# Altium PCB TM_DE_Display_REV1.0.PcbDoc (part 1 of 2)
Units mm, origin at the board's own origin, x right, y up, seen from the top; angles counter-clockwise.
Board outline 155.6 x 46.6 mm, 2 copper layers (Top Layer, Bottom Layer); 284 components, 274 nets, 1006 pads, 129 vias.
Unrouted connection lines stored in the file: 576.
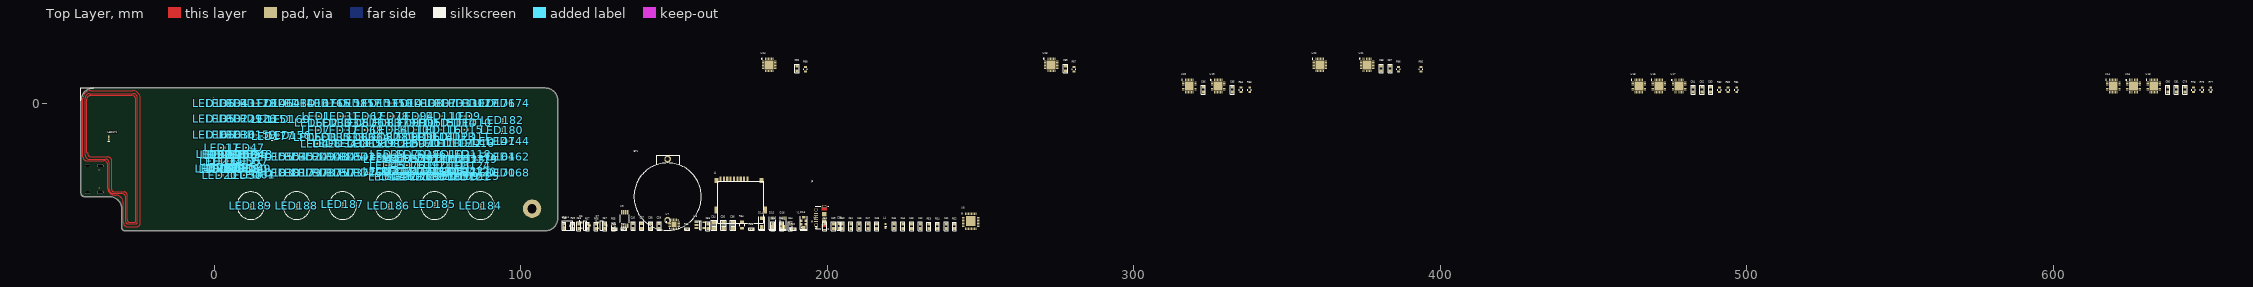
[diagram p0: Top Layer view]
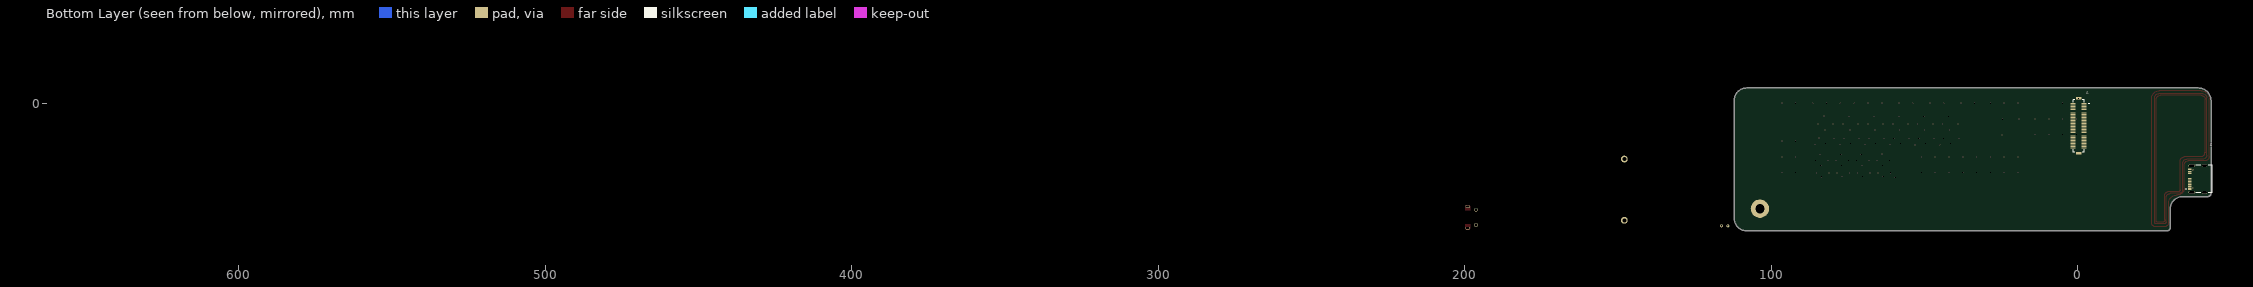
[diagram p1: Bottom Layer view, seen from below]

## Layer stack, top to bottom
Top Solder: solder mask 0.0102, Solder Resist, Dk 3.5
Top Layer: signal copper 0.0356
Dielectric 1: dielectric 0.32, FR-4, Dk 4.8
Bottom Layer: signal copper 0.0356
Bottom Solder: solder mask 0.0102, Solder Resist, Dk 3.5

## Board outline
-43.466,-29.4 ccw(c-42.446,-29.4) -42.446,-30.419 -34.266,-30.419 cw(c-34.266,-34.516) -30.169,-34.516 -30.169,-40.6 -30.166,-40.58 ccw(c-29.146,-40.58) -29.146,-41.599 -29.146,-41.6 108.037,-41.6 ccw(c108.037,-37.503) 112.134,-37.503 112.134,0.903 ccw(c108.037,0.903) 108.037,5 -39.369,5 ccw(c-39.369,0.903) -43.466,0.903

## Design rules (kind name [scope] priority, off if disabled: settings)
Clearance [All] p1: gap=0.254 ignorepadtopadclearanceinfootprint=TRUE
PolygonConnect [All] p1: connectstyle=Relief reliefconductorwidth=0.254 reliefentries=4 polygonreliefangle="90 Angle" airgapwidth=0.254
RoutingVias [All] p1: holewidth=0.711 width=1.27 viastyle="Through Hole" minholewidth=0.711 minwidth=1.27 maxholewidth=0.711 maxwidth=1.27
SolderMaskExpansion [All] p1: expansion=0 istentingtop=FALSE
SupplyNets "Schematic Supply Nets_6" [InNet('+3V3')] p1: voltage=0.000
SupplyNets "Schematic Supply Nets_5" [InNet('GND')] p2: voltage=0.000
SupplyNets "Schematic Supply Nets_4" [InNet('EARTH')] p3: voltage=0.000
SupplyNets "Schematic Supply Nets_3" [InNet('+5VDC')] p4: voltage=0.000
SupplyNets "Schematic Supply Nets_2" [InNet('VBUSA')] p5: voltage=0.000
SupplyNets "Schematic Supply Nets_1" [InNet('USB_5V')] p6: voltage=0.000
SupplyNets "Schematic Supply Nets" [InNet('+3V3DC')] p7: voltage=0.000
Width [All] p1: maxlimit=0.254 minlimit=0.254 preferedwidth=0.254
30 further rules are at their usual default settings.

## Classes and differential pairs
component class U_06_RFID_RTC_Storage: BT1 C41 C42 C43 C44 C45 C46 C47 C48 C49 C50 C51 C52 C53 C54 C55 C56 C57 C58 J4 L4 L5 R52 R53 R54 R55 R56 R57 U8 U9 XTAL1 Y1
component class U_09_Display_Leds-2: C87 C88 C89 C90 LED126 LED127 LED128 LED129 LED130 LED131 LED132 LED133 LED134 LED135 LED136 LED137 LED138 LED139 LED140 LED141 LED142 LED143 LED144 LED145 LED146 LED147 LED148 LED149 LED150 LED151 LED152 LED153 LED154 LED155 LED156 LED157 LED158 LED159 LED160 LED161 LED162 LED163 LED164 LED165 LED166 LED167 LED168 LED169 LED170 LED171 LED172 LED173 LED174 LED175 LED176 LED177 LED178 LED179 LED180 LED181 LED182 LED183 LED184 LED185 LED186 LED187 LED188 LED189 R85 R86 R87 R88 U21 U22 U23 U24
component class U_08_Display_Leds: C79 C80 C81 C82 C83 C84 C85 C86 LED1 LED2 LED3 LED4 LED5 LED6 LED7 LED8 LED9 LED10 LED11 LED12 LED13 LED14 LED15 LED16 LED17 LED18 LED19 LED20 LED21 LED22 LED23 LED24 LED25 LED26 LED27 LED28 LED29 LED30 LED31 LED32 LED33 LED34 LED35 LED36 LED37 LED38 LED39 LED40 LED41 LED42 LED43 LED44 LED45 LED46 LED47 LED48 LED49 LED50 LED51 LED52 LED53 LED54 LED55 LED56 LED57 LED58 LED59 LED60 LED61 LED62 LED63 LED64 LED65 LED66 LED67 LED68 LED69 LED70 LED71 LED72 LED73 LED74 LED75 LED76 LED77 LED78 LED79 LED80 LED81 LED82 LED83 LED84 LED85 LED86 LED87 LED88 LED89 LED90 LED91 LED92 LED93 LED94 LED95 LED96 LED97 LED98 LED99 LED100 LED101 LED102 LED103 LED104 LED105 LED106 LED107 LED108 LED109 LED110 LED111 LED112 LED113 LED114 LED115 LED116 LED117 LED118 LED119 LED120 LED121 LED122 LED123 LED124 LED125 R77 R78 R79 R80 R81 R82 R83 R84 U13 U14 U15 U16 U17 U18 U19 U20
component class U_05_USB_UART_Service: C33 C34 C35 C36 C37 C38 C39 C40 D13 D14 D15 D16 J2 J3 Q6 Q7 R32 R33 R34 R35 R36 R37 R38 R39 U6 U7
component class TOP: J1

## Components (designator, comment, footprint, x,y, rotation, side; value= is the part's Value field where it differs from the comment)
BT1 "DS1092-04-B6P" DB1092 147.964,-28.203 r90 top
C33 "CL10A105KA8NNNC" CAP_0603 203.975,-40.05 r90 top value=1uF
C34 "CL21A226MPCLRNC" CAP_0805 163.075,-39.85 r90 top value=22uF
C35 "CL21A226MPCLRNC" CAP_0805 166.175,-39.85 r90 top value=22uF
C36 "CL21A226MPCLRNC" CAP_0805 169.275,-39.85 r90 top value=22uF
C37 "CL10B104KB8NNNL" CAP_0603 139.475,-40.05 r90 top value=100nF
C38 "CL10B104KB8NNNL" CAP_0603 142.375,-40.05 r90 top value=100nF
C39 "CL10B104KB8NNNL" CAP_0603 145.175,-40.05 r90 top value=100nF
C40 "CL10B104KB8NNNL" CAP_0603 136.675,-40.05 r90 top value=100nF
C41 "CAP" CAP_0603 238.872,-40.127 r90 top value=100nF
C42 "CAP" CAP_0603 230.388,-40.127 r90 top value=100nF
C43 "CAP" CAP_0603 227.546,-40.127 r90 top value=100nF
C44 "CAP" CAP_0603 224.686,-40.127 r90 top value=100nF
C45 "CL10C150JB8NNNC" CAP_0603 221.833,-40.127 r90 top value=15pF
C46 "CL10C470JB8NNNC" CAP_0603 210.483,-40.127 r90 top value=47pF
C47 "CL10C181JB8NNNC" CAP_0603 213.332,-40.127 r90 top value=180pF
C48 "CL10C100CB8NNNC" CAP_0603 216.172,-40.127 r90 top value=10pF
C49 "CL10C470JB8NNNC" CAP_0603 202.073,-40.127 r90 top value=47pF
C50 "CL10C181JB8NNNC" CAP_0603 204.912,-40.127 r90 top value=180pF
C51 "CL10C100CB8NNNC" CAP_0603 207.748,-40.127 r90 top value=10pF
C52 "CL10C150JB8NNNC" CAP_0603 199.236,-40.127 r90 top value=15pF
C53 "CL10C180JB8NNNC" CAP_0603 185.145,-40.127 r90 top value=18pF
C54 "CL10C180JB8NNNC" CAP_0603 187.987,-40.127 r90 top value=18pF
C55 "CAP" CAP_0603 182.291,-40.127 r90 top value=100nF
C56 "CAP" CAP_0603 161.072,-40.127 r90 top value=100nF
C57 "CL10C180JB8NNNC" CAP_0603 127.473,-40.127 r90 top value=18pF
C58 "CL10C180JB8NNNC" CAP_0603 118.997,-40.127 r90 top value=18pF
C79 "CAP" CAP_0603 643.074,4.45 r90 top value=100nF
C80 "CAP" CAP_0603 637.474,4.45 r90 top value=100nF
C81 "CAP" CAP_0603 640.274,4.45 r90 top value=100nF
C82 "CAP" CAP_0603 485.474,4.45 r90 top value=100nF
C83 "CAP" CAP_0603 488.274,4.45 r90 top value=100nF
C84 "CAP" CAP_0603 482.574,4.45 r90 top value=100nF
C85 "CAP" CAP_0603 332.175,4.45 r90 top value=100nF
C86 "CAP" CAP_0603 322.775,4.45 r90 top value=100nF
C87 "CAP" CAP_0603 383.674,11.35 r90 top value=100nF
C88 "CAP" CAP_0603 380.774,11.35 r90 top value=100nF
C89 "CAP" CAP_0603 277.775,11.35 r90 top value=100nF
C90 "CAP" CAP_0603 190.175,11.35 r90 top value=100nF
D13 "PMEG4010EGWJ" SOD-123 192.375,-38.85 r90 top value="40V 1A"
D14 "ATV02W5V0B-HF" SOD-123F 178.675,-38.95 r90 top
D15 "ATV02W5V0B-HF" SOD-123F 182.175,-38.95 r90 top
D16 "ATV02W5V0B-HF" SOD-123F 185.675,-38.95 r90 top
J1 "DF12NB(3.0)-60DS-0.5V(51)" HRS_DF12NB(3.0)-60DS-0.5V(51) -0.266,-7.35 r90 bottom
J2 "TYPE-C 16PIN 2MD(073)" HRO_TYPE-C-31-M-12 -41.336,-24.725 r90 bottom
J3 "10118194-0001LF" AMPHENOL_10118194-0001LF 199.075,-37.25 r90 top
J4 "microsd" microSD_2 171.76,-29.941 r0 top
L4 "LQM18PN2R2NC0L" LQM18PN1R0NC0L 219.077,-40.075 r90 top value=2.2uH
L5 "LQM18PN2R2NC0L" LQM18PN1R0NC0L 196.481,-40.075 r90 top value=2.2uH
LED1 "YLED0402R" APHHS1005LSECKJ3PF 33.538,-4.287 r180 top value=0402
LED2 "YLED0402R" APHHS1005LSECKJ3PF 35.992,-6.314 r86 top value=0402
LED3 "YLED0402R" APHHS1005LSECKJ3PF 35.662,-11.013 r86 top value=0402
LED4 "YLED0402R" APHHS1005LSECKJ3PF 32.995,-13.147 r180 top value=0402
LED5 "YLED0402R" APHHS1005LSECKJ3PF 30.683,-11.038 r86 top value=0402
LED6 "YLED0402R" APHHS1005LSECKJ3PF 31.014,-6.314 r86 top value=0402
LED7 "YLED0402R" APHHS1005LSECKJ3PF 33.259,-8.727 r180 top value=0402
LED8 "YLED0402R" APHHS1005LSECKJ3PF 36.932,-13.07 r86 top value=0402
LED9 "YLED0402R" APHHS1005LSECKJ3PF 82.375,-4.243 r180 top value=0402
LED10 "YLED0402R" APHHS1005LSECKJ3PF 84.828,-6.27 r86 top value=0402
LED11 "YLED0402R" APHHS1005LSECKJ3PF 84.498,-10.969 r86 top value=0402
LED12 "YLED0402R" APHHS1005LSECKJ3PF 81.831,-13.102 r180 top value=0402
LED13 "YLED0402R" APHHS1005LSECKJ3PF 79.52,-10.994 r86 top value=0402
LED14 "YLED0402R" APHHS1005LSECKJ3PF 79.85,-6.27 r86 top value=0402
LED15 "YLED0402R" APHHS1005LSECKJ3PF 82.095,-8.683 r180 top value=0402
LED16 "YLED0402R" APHHS1005LSECKJ3PF 85.768,-13.026 r86 top value=0402
LED17 "YLED0402R" APHHS1005LSECKJ3PF 2.618,-14.465 r180 top value=0402
LED18 "YLED0402R" APHHS1005LSECKJ3PF 5.134,-16.6 r265 top value=0402
LED19 "YLED0402R" APHHS1005LSECKJ3PF 4.734,-21.4 r86 top value=0402
LED20 "YLED0402R" APHHS1005LSECKJ3PF 1.934,-23.5 r180 top value=0402
LED21 "YLED0402R" APHHS1005LSECKJ3PF -0.266,-21.3 r86 top value=0402
LED22 "YLED0402R" APHHS1005LSECKJ3PF 0.034,-16.6 r86 top value=0402
LED23 "YLED0402R" APHHS1005LSECKJ3PF 1.085,-18.951 r180 top value=0402
LED24 "YLED0402R" APHHS1005LSECKJ3PF 3.785,-18.951 r180 top value=0402
LED25 "YLED0402R" APHHS1005LSECKJ3PF 1.311,-16.751 r300 top value=0402
LED26 "YLED0402R" APHHS1005LSECKJ3PF 2.584,-16.95 r266 top value=0402
LED27 "YLED0402R" APHHS1005LSECKJ3PF 3.833,-16.651 r230 top value=0402
LED28 "YLED0402R" APHHS1005LSECKJ3PF 0.985,-21.5 r230 top value=0402
LED29 "YLED0402R" APHHS1005LSECKJ3PF 2.234,-20.9 r86 top value=0402
LED30 "YLED0402R" APHHS1005LSECKJ3PF 3.509,-21.425 r120 top value=0402
LED31 "YLED0402R" APHHS1005LSECKJ3PF 41.682,-4.287 r180 top value=0402
LED32 "YLED0402R" APHHS1005LSECKJ3PF 44.136,-6.314 r86 top value=0402
LED33 "YLED0402R" APHHS1005LSECKJ3PF 43.806,-11.013 r86 top value=0402
LED34 "YLED0402R" APHHS1005LSECKJ3PF 41.139,-13.147 r180 top value=0402
LED35 "YLED0402R" APHHS1005LSECKJ3PF 38.827,-11.038 r86 top value=0402
LED36 "YLED0402R" APHHS1005LSECKJ3PF 39.157,-6.314 r86 top value=0402
LED37 "YLED0402R" APHHS1005LSECKJ3PF 41.403,-8.727 r180 top value=0402
LED38 "YLED0402R" APHHS1005LSECKJ3PF 45.076,-13.07 r86 top value=0402
LED39 "YLED0402R" APHHS1005LSECKJ3PF 56.815,-16.639 r180 top value=0402
LED40 "YLED0402R" APHHS1005LSECKJ3PF 58.831,-18.174 r86 top value=0402
LED41 "YLED0402R" APHHS1005LSECKJ3PF 58.526,-22.235 r86 top value=0402
LED42 "YLED0402R" APHHS1005LSECKJ3PF 56.353,-23.918 r180 top value=0402
LED43 "YLED0402R" APHHS1005LSECKJ3PF 54.438,-22.216 r86 top value=0402
LED44 "YLED0402R" APHHS1005LSECKJ3PF 54.725,-18.211 r86 top value=0402
LED45 "YLED0402R" APHHS1005LSECKJ3PF 56.612,-20.265 r180 top value=0402
LED46 "YLED0402R" APHHS1005LSECKJ3PF 59.599,-23.807 r86 top value=0402
LED47 "YLED0402R" APHHS1005LSECKJ3PF 10.859,-14.47 r180 top value=0402
LED48 "YLED0402R" APHHS1005LSECKJ3PF 13.375,-16.605 r265 top value=0402
LED49 "YLED0402R" APHHS1005LSECKJ3PF 12.975,-21.405 r86 top value=0402
LED50 "YLED0402R" APHHS1005LSECKJ3PF 10.175,-23.505 r180 top value=0402
LED51 "YLED0402R" APHHS1005LSECKJ3PF 7.975,-21.305 r86 top value=0402
LED52 "YLED0402R" APHHS1005LSECKJ3PF 8.275,-16.605 r86 top value=0402
LED53 "YLED0402R" APHHS1005LSECKJ3PF 9.551,-16.756 r300 top value=0402
LED54 "YLED0402R" APHHS1005LSECKJ3PF 10.825,-16.955 r266 top value=0402
LED55 "YLED0402R" APHHS1005LSECKJ3PF 12.073,-16.656 r230 top value=0402
LED56 "YLED0402R" APHHS1005LSECKJ3PF 9.326,-18.956 r180 top value=0402
LED57 "YLED0402R" APHHS1005LSECKJ3PF 12.026,-18.956 r180 top value=0402
LED58 "YLED0402R" APHHS1005LSECKJ3PF 9.226,-21.505 r230 top value=0402
LED59 "YLED0402R" APHHS1005LSECKJ3PF 10.475,-20.905 r86 top value=0402
LED60 "YLED0402R" APHHS1005LSECKJ3PF 11.75,-21.431 r120 top value=0402
LED61 "YLED0402R" APHHS1005LSECKJ3PF 14.272,-23.352 r86 top value=0402
LED62 "YLED0402R" APHHS1005LSECKJ3PF 49.821,-4.28 r180 top value=0402
LED63 "YLED0402R" APHHS1005LSECKJ3PF 52.274,-6.308 r86 top value=0402
LED64 "YLED0402R" APHHS1005LSECKJ3PF 51.944,-11.007 r86 top value=0402
LED65 "YLED0402R" APHHS1005LSECKJ3PF 49.277,-13.14 r180 top value=0402
LED66 "YLED0402R" APHHS1005LSECKJ3PF 46.966,-11.032 r86 top value=0402
LED67 "YLED0402R" APHHS1005LSECKJ3PF 47.296,-6.308 r86 top value=0402
LED68 "YLED0402R" APHHS1005LSECKJ3PF 49.541,-8.721 r180 top value=0402
LED69 "YLED0402R" APHHS1005LSECKJ3PF 53.214,-13.064 r86 top value=0402
LED70 "YLED0402R" APHHS1005LSECKJ3PF 63.504,-16.639 r180 top value=0402
LED71 "YLED0402R" APHHS1005LSECKJ3PF 65.52,-18.174 r86 top value=0402
LED72 "YLED0402R" APHHS1005LSECKJ3PF 65.215,-22.235 r86 top value=0402
LED73 "YLED0402R" APHHS1005LSECKJ3PF 63.042,-23.918 r180 top value=0402
LED74 "YLED0402R" APHHS1005LSECKJ3PF 61.127,-22.216 r86 top value=0402
LED75 "YLED0402R" APHHS1005LSECKJ3PF 61.414,-18.211 r86 top value=0402
LED76 "YLED0402R" APHHS1005LSECKJ3PF 63.301,-20.265 r180 top value=0402
LED77 "YLED0402R" APHHS1005LSECKJ3PF 66.273,-23.848 r86 top value=0402
LED78 "YLED0402R" APHHS1005LSECKJ3PF 57.957,-4.265 r180 top value=0402
LED79 "YLED0402R" APHHS1005LSECKJ3PF 60.41,-6.292 r86 top value=0402
LED80 "YLED0402R" APHHS1005LSECKJ3PF 60.08,-10.991 r86 top value=0402
LED81 "YLED0402R" APHHS1005LSECKJ3PF 57.413,-13.125 r180 top value=0402
LED82 "YLED0402R" APHHS1005LSECKJ3PF 55.102,-11.016 r86 top value=0402
LED83 "YLED0402R" APHHS1005LSECKJ3PF 55.432,-6.292 r86 top value=0402
LED84 "YLED0402R" APHHS1005LSECKJ3PF 57.677,-8.705 r180 top value=0402
LED85 "YLED0402R" APHHS1005LSECKJ3PF 61.35,-13.048 r86 top value=0402
LED86 "YLED0402R" APHHS1005LSECKJ3PF 70.204,-16.649 r180 top value=0402
LED87 "YLED0402R" APHHS1005LSECKJ3PF 72.22,-18.184 r86 top value=0402
LED88 "YLED0402R" APHHS1005LSECKJ3PF 71.915,-22.245 r86 top value=0402
LED89 "YLED0402R" APHHS1005LSECKJ3PF 69.742,-23.928 r180 top value=0402
LED90 "YLED0402R" APHHS1005LSECKJ3PF 67.827,-22.226 r86 top value=0402
LED91 "YLED0402R" APHHS1005LSECKJ3PF 68.114,-18.221 r86 top value=0402
LED92 "YLED0402R" APHHS1005LSECKJ3PF 70.001,-20.275 r180 top value=0402
LED93 "YLED0402R" APHHS1005LSECKJ3PF 72.984,-23.791 r86 top value=0402
LED94 "YLED0402R" APHHS1005LSECKJ3PF 66.1,-4.265 r180 top value=0402
LED95 "YLED0402R" APHHS1005LSECKJ3PF 68.554,-6.292 r86 top value=0402
LED96 "YLED0402R" APHHS1005LSECKJ3PF 68.224,-10.991 r86 top value=0402
LED97 "YLED0402R" APHHS1005LSECKJ3PF 65.557,-13.125 r180 top value=0402
LED98 "YLED0402R" APHHS1005LSECKJ3PF 63.245,-11.016 r86 top value=0402
LED99 "YLED0402R" APHHS1005LSECKJ3PF 63.576,-6.292 r86 top value=0402
LED100 "YLED0402R" APHHS1005LSECKJ3PF 65.821,-8.705 r180 top value=0402
LED101 "YLED0402R" APHHS1005LSECKJ3PF 69.494,-13.048 r86 top value=0402
LED102 "YLED0402R" APHHS1005LSECKJ3PF 76.912,-16.664 r180 top value=0402
LED103 "YLED0402R" APHHS1005LSECKJ3PF 78.928,-18.199 r86 top value=0402
LED104 "YLED0402R" APHHS1005LSECKJ3PF 78.623,-22.26 r86 top value=0402
LED105 "YLED0402R" APHHS1005LSECKJ3PF 76.45,-23.943 r180 top value=0402
LED106 "YLED0402R" APHHS1005LSECKJ3PF 74.535,-22.241 r86 top value=0402
LED107 "YLED0402R" APHHS1005LSECKJ3PF 74.822,-18.236 r86 top value=0402
LED108 "YLED0402R" APHHS1005LSECKJ3PF 76.709,-20.29 r180 top value=0402
LED109 "YLED0402R" APHHS1005LSECKJ3PF 79.684,-23.776 r86 top value=0402
LED110 "YLED0402R" APHHS1005LSECKJ3PF 74.239,-4.258 r180 top value=0402
LED111 "YLED0402R" APHHS1005LSECKJ3PF 76.693,-6.285 r86 top value=0402
LED112 "YLED0402R" APHHS1005LSECKJ3PF 76.362,-10.984 r86 top value=0402
LED113 "YLED0402R" APHHS1005LSECKJ3PF 73.695,-13.118 r180 top value=0402
LED114 "YLED0402R" APHHS1005LSECKJ3PF 71.384,-11.01 r86 top value=0402
LED115 "YLED0402R" APHHS1005LSECKJ3PF 71.714,-6.285 r86 top value=0402
LED116 "YLED0402R" APHHS1005LSECKJ3PF 73.959,-8.698 r180 top value=0402
LED117 "YLED0402R" APHHS1005LSECKJ3PF 77.632,-13.042 r86 top value=0402
LED118 "YLED0402R" APHHS1005LSECKJ3PF 83.619,-16.678 r180 top value=0402
LED119 "YLED0402R" APHHS1005LSECKJ3PF 85.635,-18.213 r86 top value=0402
LED120 "YLED0402R" APHHS1005LSECKJ3PF 85.33,-22.274 r86 top value=0402
LED121 "YLED0402R" APHHS1005LSECKJ3PF 83.157,-23.957 r180 top value=0402
LED122 "YLED0402R" APHHS1005LSECKJ3PF 81.242,-22.255 r86 top value=0402
LED123 "YLED0402R" APHHS1005LSECKJ3PF 81.529,-18.25 r86 top value=0402
LED124 "YLED0402R" APHHS1005LSECKJ3PF 83.416,-20.304 r180 top value=0402
LED125 "YLED0402R" APHHS1005LSECKJ3PF 86.398,-23.815 r86 top value=0402
LED126 "YLED0402R" APHHS1005LSECKJ3PF 13.5,-5.1 r180 top value=0402
LED127 "YLED0402R" APHHS1005LSECKJ3PF 86.049,0 r180 top value=0402
LED128 "YLED0402R" APHHS1005LSECKJ3PF 13.5,0 r180 top value=0402
LED129 "YLED0402R" APHHS1005LSECKJ3PF 9,-5.1 r180 top value=0402
LED130 "YLED0402R" APHHS1005LSECKJ3PF 81.549,0 r180 top value=0402
LED131 "YLED0402R" APHHS1005LSECKJ3PF 9,0 r180 top value=0402
LED132 "YLED0402R" APHHS1005LSECKJ3PF 4.5,-5.1 r180 top value=0402
LED133 "YLED0402R" APHHS1005LSECKJ3PF 77.05,0 r180 top value=0402
LED134 "YLED0402R" APHHS1005LSECKJ3PF 4.5,0 r180 top value=0402
LED135 "YLED0402R" APHHS1005LSECKJ3PF 0,-5.1 r180 top value=0402
LED136 "YLED0402R" APHHS1005LSECKJ3PF 0,0 r180 top value=0402
LED137 "YLED0402R" APHHS1005LSECKJ3PF 72.5,0 r180 top value=0402
LED138 "YLED0402R" APHHS1005LSECKJ3PF 68,0 r180 top value=0402
LED139 "YLED0402R" APHHS1005LSECKJ3PF 50.599,-17.5 r180 top value=0402
LED140 "YLED0402R" APHHS1005LSECKJ3PF 28.1,0 r180 top value=0402
LED141 "YLED0402R" APHHS1005LSECKJ3PF 63.5,0 r180 top value=0402
LED142 "YLED0402R" APHHS1005LSECKJ3PF 46.099,-17.5 r180 top value=0402
LED143 "YLED0402R" APHHS1005LSECKJ3PF 23.6,0 r180 top value=0402
LED144 "YLED0402R" APHHS1005LSECKJ3PF 96.1,-12.4 r180 top value=0402
LED145 "YLED0402R" APHHS1005LSECKJ3PF 41.599,-17.5 r180 top value=0402
LED146 "YLED0402R" APHHS1005LSECKJ3PF 19.1,0 r180 top value=0402
LED147 "YLED0402R" APHHS1005LSECKJ3PF 91.6,-12.4 r180 top value=0402
LED148 "YLED0402R" APHHS1005LSECKJ3PF 37.099,-17.5 r180 top value=0402
LED149 "YLED0402R" APHHS1005LSECKJ3PF 32.6,-17.5 r180 top value=0402
LED150 "YLED0402R" APHHS1005LSECKJ3PF 57.9,0 r180 top value=0402
LED151 "YLED0402R" APHHS1005LSECKJ3PF 19.134,-5.2 r90 top value=0402
LED152 "YLED0402R" APHHS1005LSECKJ3PF 28.1,-17.5 r180 top value=0402
LED153 "YLED0402R" APHHS1005LSECKJ3PF 53.4,0 r180 top value=0402
LED154 "YLED0402R" APHHS1005LSECKJ3PF 23.6,-17.5 r180 top value=0402
LED155 "YLED0402R" APHHS1005LSECKJ3PF 19.1,-17.5 r180 top value=0402
LED156 "YLED0402R" APHHS1005LSECKJ3PF 24.734,-10.4 r90 top value=0402
LED157 "YLED0402R" APHHS1005LSECKJ3PF 47.8,0 r180 top value=0402
LED158 "YLED0402R" APHHS1005LSECKJ3PF 43.3,0 r180 top value=0402
LED159 "YLED0402R" APHHS1005LSECKJ3PF 13.5,-10.2 r180 top value=0402
LED160 "YLED0402R" APHHS1005LSECKJ3PF 24.534,-5.2 r90 top value=0402
LED161 "YLED0402R" APHHS1005LSECKJ3PF 9,-10.2 r180 top value=0402
LED162 "YLED0402R" APHHS1005LSECKJ3PF 96.1,-17.5 r180 top value=0402
LED163 "YLED0402R" APHHS1005LSECKJ3PF 4.5,-10.2 r180 top value=0402
LED164 "YLED0402R" APHHS1005LSECKJ3PF 91.6,-17.5 r180 top value=0402
LED165 "YLED0402R" APHHS1005LSECKJ3PF 37.7,0 r180 top value=0402
LED166 "YLED0402R" APHHS1005LSECKJ3PF 0,-10.2 r180 top value=0402
LED167 "YLED0402R" APHHS1005LSECKJ3PF 33.2,0 r180 top value=0402
LED168 "YLED0402R" APHHS1005LSECKJ3PF 96.1,-22.6 r180 top value=0402
LED169 "YLED0402R" APHHS1005LSECKJ3PF 50.599,-22.6 r180 top value=0402
LED170 "YLED0402R" APHHS1005LSECKJ3PF 91.6,-22.6 r180 top value=0402
LED171 "LTW-C283DS5" APHHS1005LSECKJ3PF -34.366,-11.376 r90 top value=0402
LED172 "YLED0402R" APHHS1005LSECKJ3PF 46.099,-22.6 r180 top value=0402
LED173 "YLED0402R" APHHS1005LSECKJ3PF 41.599,-22.6 r180 top value=0402
LED174 "YLED0402R" APHHS1005LSECKJ3PF 96.1,0 r180 top value=0402
LED175 "YLED0402R" APHHS1005LSECKJ3PF 37.099,-22.6 r180 top value=0402
LED176 "YLED0402R" APHHS1005LSECKJ3PF 91.6,0 r180 top value=0402
LED177 "L1MC-RGB0028000MP0" L1MCRGB0028000MP0 19.234,-10.7 r0 top
LED178 "YLED0402R" APHHS1005LSECKJ3PF 32.6,-22.6 r180 top value=0402
LED179 "YLED0402R" APHHS1005LSECKJ3PF 28.1,-22.6 r180 top value=0402
LED180 "YLED0402R" APHHS1005LSECKJ3PF 93.955,-8.727 r90 top value=0402
LED181 "YLED0402R" APHHS1005LSECKJ3PF 23.6,-22.6 r180 top value=0402
LED182 "YLED0402R" APHHS1005LSECKJ3PF 94.082,-5.577 r90 top value=0402
LED183 "YLED0402R" APHHS1005LSECKJ3PF 19.1,-22.6 r180 top value=0402
LED184 "YLED0402R" APHHS1005LSECKJ3PF 86.934,-33.4 r90 top value=0402
LED185 "YLED0402R" APHHS1005LSECKJ3PF 71.934,-32.95 r90 top value=0402
LED186 "YLED0402R" APHHS1005LSECKJ3PF 56.934,-33.4 r90 top value=0402
LED187 "YLED0402R" APHHS1005LSECKJ3PF 41.934,-32.95 r90 top value=0402
LED188 "YLED0402R" APHHS1005LSECKJ3PF 26.934,-33.4 r90 top value=0402
LED189 "YLED0402R" APHHS1005LSECKJ3PF 11.934,-33.4 r90 top value=0402
Q6 "MMBTA42_R1_00001" SOT-23-3 121.075,-39.85 r0 top value="300V 0.5A"
Q7 "MMBTA42_R1_00001" SOT-23-3 126.475,-39.85 r0 top value="300V 0.5A"
R32 "RC0402JR-0710KL" RES_0402 189.075,-41.05 r0 top value=10K
R33 "RC0402JR-0710KL" RES_0402 175.375,-41.05 r0 top value=10K
R34 "RES" RES_0805 172.275,-39.75 r0 top value=2.2M
R35 "RC0402JR-0710KL" RES_0402 154.375,-41.05 r0 top value=10K
R36 "RC0402JR-0710KL" RES_0402 130.675,-41.05 r0 top value=10K
R37 "RC0402JR-0710KL" RES_0402 133.775,-41.05 r0 top value=10K
R38 "0603SAF4702T5E" RES_0603#1 114.175,-40.15 r90 top value=47K
R39 "0603SAF4702T5E" RES_0603#1 116.975,-40.15 r90 top value=47K
R52 "RES" RES_0603#1 241.578,-40.195 r90 top value=10K
R53 "0603SAJ0821T5E" RES_0603#1 233.195,-40.195 r90 top value=820R
R54 "RC0603FR-075K1L" RES_0603#1 236.01,-40.195 r90 top value=5.1K
R55 "RES" RES_0603#1 130.285,-40.195 r90 top value=10K
R56 "0603SAF3300T5E" RES_0603#1 124.623,-40.195 r90 top value=330R
R57 "0603SAF3300T5E" RES_0603#1 121.809,-40.195 r90 top value=330R
R77 "RC0603FR-133K6L" RES_0603#2 651.474,4.35 r0 top value=3.6K
R78 "RC0603FR-133K6L" RES_0603#2 645.874,4.35 r0 top value=3.6K
R79 "RC0603FR-133K6L" RES_0603#2 648.674,4.35 r0 top value=3.6K
R80 "RC0603FR-133K6L" RES_0603#2 493.974,4.35 r0 top value=3.6K
R81 "RC0603FR-133K6L" RES_0603#2 496.774,4.35 r0 top value=3.6K
R82 "RC0603FR-133K6L" RES_0603#2 491.174,4.35 r0 top value=3.6K
R83 "RC0603FR-133K6L" RES_0603#2 337.875,4.35 r0 top value=3.6K
R84 "RC0603FR-133K6L" RES_0603#2 335.075,4.35 r0 top value=3.6K
R85 "RC0603FR-133K6L" RES_0603#2 393.774,11.15 r0 top value=3.6K
R86 "RC0603FR-133K6L" RES_0603#2 386.474,11.15 r0 top value=3.6K
R87 "RC0603FR-133K6L" RES_0603#2 280.575,11.15 r0 top value=3.6K
R88 "RC0603FR-133K6L" RES_0603#2 192.975,11.15 r0 top value=3.6K
U6 "DIO7002AST5" SOT95P280X125-5N 158.675,-39.75 r0 top
U7 "CH343P" QFN50P300X300X80-17N 150.075,-39.45 r0 top
U8 "MFRC52201HN1,115" QFN50P500X500X100-33N-D 246.868,-38.45 r0 top
U9 "MCP79410T-I/MS" 8_MSOP 133.993,-37.717 r90 top
U13 "CAT4016HV6-GT2" QFN50P400X400X80-25N-D 632.874,5.65 r0 top
U14 "CAT4016HV6-GT2" QFN50P400X400X80-25N-D 619.674,5.65 r0 top
U15 "CAT4016HV6-GT2" QFN50P400X400X80-25N-D 626.274,5.65 r0 top
U16 "CAT4016HV6-GT2" QFN50P400X400X80-25N-D 471.374,5.65 r0 top
U17 "CAT4016HV6-GT2" QFN50P400X400X80-25N-D 477.974,5.65 r0 top
U18 "CAT4016HV6-GT2" QFN50P400X400X80-25N-D 464.874,5.65 r0 top
U19 "CAT4016HV6-GT2" QFN50P400X400X80-25N-D 327.575,5.65 r0 top
U20 "CAT4016HV6-GT2" QFN50P400X400X80-25N-D 318.175,5.65 r0 top
U21 "CAT4016HV6-GT2" QFN50P400X400X80-25N-D 376.174,12.55 r0 top
U22 "CAT4016HV6-GT2" QFN50P400X400X80-25N-D 360.774,12.55 r0 top
U23 "CAT4016HV6-GT2" QFN50P400X400X80-25N-D 273.075,12.55 r0 top
U24 "CAT4016HV6-GT2" QFN50P400X400X80-25N-D 181.075,12.55 r0 top
XTAL1 "R38-32.768-12.5-EXT-5PPM" R38_THT_2 115.221,-39.998 r0 top
Y1 "ECS-271.2-10-37-CKM-TR" ECS27121037CKMTR 192.286,-38.9 r0 top

## Footprints (in the part's own frame and the unit in brackets; to place one, negate y for a bottom-side part, rotate by r counter-clockwise, add the part's x,y. Pads: shape width x height; smd on the part's side, far side on the other; paste and mask are expansions set on the pad)
8_MSOP [mm]
  rect 1.45x0.45 smd: 1(-2.2,0.975) 2(-2.2,0.325) 3(-2.2,-0.325) 4(-2.2,-0.975) 5(2.2,-0.975) 6(2.2,-0.325) 7(2.2,0.325) 8(2.2,0.975)
  silkscreen extent -3.78,-1.5 1.3,1.5, body extent -2.32,-1.5 2.58,1.5, height 1.1
AMPHENOL_10118194-0001LF [mm]
  rect 0.4x1.35 smd: 1(-1.3,2.675) 2(-0.65,2.675) 3(0,2.675) 4(0.65,2.675) 5(1.3,2.675)
  oval 0.775x1.55 hole 0.5 slot 1.15 at 90 deg mask+0: SH1(-3.5,0) SH4(3.5,0)
  rect 1.5x1.55 smd: SH2(1,0) SH3(-1,0)
  oval 1.3x0.95 hole 0.55 slot 0.9 at 0 deg: SH5(-2.5,2.7) SH6(2.5,2.7)
  Top Layer region: -2.3,-0.775 -3.445,-0.775 -3.471,-0.774 -3.497,-0.772 -3.523,-0.769 -3.549,-0.764 -3.574,-0.758 -3.6,-0.751 -3.624,-0.742 -3.648,-0.732 -3.672,-0.721 -3.695,-0.708 -3.717,-0.694 -3.739,-0.68 -3.76,-0.664 -3.78,-0.647 -3.799,-0.629 -3.817,-0.61 -3.834,-0.59 -3.85,-0.569 -3.864,-0.547 -3.878,-0.525 -3.891,-0.502 -3.902,-0.478 -3.912,-0.454 -3.921,-0.43 -3.928,-0.404 -3.934,-0.379 -3.939,-0.353 -3.942,-0.327 -3.944,-0.301 -3.945,-0.275 -3.945,0.275 -3.944,0.301 -3.942,0.327 -3.939,0.353 -3.934,0.379 -3.928,0.404 -3.921,0.43 -3.912,0.454 -3.902,0.478 -3.891,0.502 -3.878,0.525 -3.864,0.547 -3.85,0.569 -3.834,0.59 -3.817,0.61 -3.799,0.629 -3.78,0.647 -3.76,0.664 -3.739,0.68 -3.717,0.694 -3.695,0.708 -3.672,0.721 -3.648,0.732 -3.624,0.742 -3.6,0.751 -3.574,0.758 -3.549,0.764 -3.523,0.769 -3.497,0.772 -3.471,0.774 -3.445,0.775 -2.3,0.775
  Top Layer region: 3.471,0.774 3.497,0.772 3.523,0.769 3.549,0.764 3.574,0.758 3.6,0.751 3.624,0.742 3.648,0.732 3.672,0.721 3.695,0.708 3.717,0.694 3.739,0.68 3.76,0.664 3.78,0.647 3.799,0.629 3.817,0.61 3.834,0.59 3.85,0.569 3.864,0.547 3.878,0.525 3.891,0.502 3.902,0.478 3.912,0.454 3.921,0.43 3.928,0.404 3.934,0.379 3.939,0.353 3.942,0.327 3.944,0.301 3.945,0.275 3.945,-0.275 3.944,-0.301 3.942,-0.327 3.939,-0.353 3.934,-0.379 3.928,-0.404 3.921,-0.43 3.912,-0.454 3.902,-0.478 3.891,-0.502 3.878,-0.525 3.864,-0.547 3.85,-0.569 3.834,-0.59 3.817,-0.61 3.799,-0.629 3.78,-0.647 3.76,-0.664 3.739,-0.68 3.717,-0.694 3.695,-0.708 3.672,-0.721 3.648,-0.732 3.624,-0.742 3.6,-0.751 3.574,-0.758 3.549,-0.764 3.523,-0.769 3.497,-0.772 3.471,-0.774 3.445,-0.775 2.3,-0.775 2.3,0.775 3.445,0.775
  silkscreen extent -3.7,-1.45 3.7,4.1, body extent -4.02,-2.68 4.02,2.85, height 2.67
APHHS1005LSECKJ3PF [mm]
  rect 0.7x0.5 smd: 1(-0.45,0) 2(0.45,0)
  silkscreen extent -1,-0.3 -1,0.3, body extent -0.51,-0.25 0.49,0.25, height 0.5
CAP_0603 [mm]
  rect 0.95x0.95 smd mask+0.1: 1(-0.775,0) 2(0.775,0)
  silkscreen extent -1.42,-0.66 1.42,0.66, body extent -1.05,-0.51 1.05,0.52, height 0.8
CAP_0805 [mm]
  rect 1.1x1.4 smd mask+0.05: 1(-0.95,0) 2(0.95,0)
  silkscreen extent -1.65,-0.84 1.65,0.84, body extent -1.3,-0.68 1.3,0.68, height 0.9
DB1092 [mm]
  round 2.2 hole 1.3: 1(-10,0) 2(10,0)
  silkscreen extent -13.27,-11 11.23,11, body extent -13.27,-11 11.23,11, height 8.5
ECS27121037CKMTR [mm]
  rect 0.85x0.75 smd: 1(-0.675,-0.525) 2(0.675,-0.525) 3(0.675,0.525) 4(-0.675,0.525)
  silkscreen extent -0.7,-1.65 -0.6,-1.55, body extent -1.02,-0.82 1.02,0.82, height 0.65
HRO_TYPE-C-31-M-12 [mm]
  rect 0.6x1.14 smd mask+0.05: A1_B12(-3.2,4.75) A4_B9(-2.4,4.75) B1_A12(3.2,4.75) B4_A9(2.4,4.75)
  rect 0.3x1.14 smd mask+0.05: A5(-1.25,4.75) A6(-0.25,4.75) A7(0.25,4.75) A8(1.25,4.75) B5(1.75,4.75) B6(0.75,4.75) B7(-0.75,4.75) B8(-1.75,4.75)
  oval 0.9x2 hole 0.6 slot 1.7 at 90 deg: S1(-4.325,4.17) S2(4.325,4.17)
  oval 0.9x1.7 hole 0.6 slot 1.4 at 90 deg: S3(-4.325,0) S4(4.325,0)
  round 0.6 hole 0.6 unplated: ""(-2.89,3.68) ""(2.89,3.68)
  silkscreen extent -4.47,-2.6 4.47,6.1, body extent -4.47,-2.6 4.47,5.31, height 3.31
HRS_DF12NB(3.0)-60DS-0.5V(51) [mm]
  rect 0.3x1.6 smd paste-2 mask+0.05: 1(7.25,-1.8) 2(7.25,1.8) 3(6.75,-1.8) 4(6.75,1.8) 5(6.25,-1.8) 6(6.25,1.8) 7(5.75,-1.8) 8(5.75,1.8) 9(5.25,-1.8) 10(5.25,1.8) 11(4.75,-1.8) 12(4.75,1.8) 13(4.25,-1.8) 14(4.25,1.8) 15(3.75,-1.8) 16(3.75,1.8) 17(3.25,-1.8) 18(3.25,1.8) 19(2.75,-1.8) 20(2.75,1.8) 21(2.25,-1.8) 22(2.25,1.8) 23(1.75,-1.8) 24(1.75,1.8) 25(1.25,-1.8) 26(1.25,1.8) 27(0.75,-1.8) 28(0.75,1.8) 29(0.25,-1.8) 30(0.25,1.8) 31(-0.25,-1.8) 32(-0.25,1.8) 33(-0.75,-1.8) 34(-0.75,1.8) 35(-1.25,-1.8) 36(-1.25,1.8) 37(-1.75,-1.8) 38(-1.75,1.8) 39(-2.25,-1.8) 40(-2.25,1.8) 41(-2.75,-1.8) 42(-2.75,1.8) 43(-3.25,-1.8) 44(-3.25,1.8) 45(-3.75,-1.8) 46(-3.75,1.8) 47(-4.25,-1.8) 48(-4.25,1.8) 49(-4.75,-1.8) 50(-4.75,1.8) 51(-5.25,-1.8) 52(-5.25,1.8) 53(-5.75,-1.8) 54(-5.75,1.8) 55(-6.25,-1.8) 56(-6.25,1.8) 57(-6.75,-1.8) 58(-6.75,1.8) 59(-7.25,-1.8) 60(-7.25,1.8)
  rect 0.8x1.8 smd paste+0 mask+0.102: S1(8.95,0) S2(-8.95,0)
  silkscreen extent -8.55,-3.45 8.55,1.8, body extent -9.05,-2.3 9.05,2.3, height 2.2
L1MCRGB0028000MP0 [mm]
  rect 1.05x0.56 smd: 1(-1.425,-0.85) 2(1.425,-0.85) 3(-1.425,0) 4(1.425,0) 5(-1.425,0.85) 6(1.425,0.85)
  silkscreen extent -2.4,-1.4 0.6,1.4, body extent -1.75,-1.4 1.75,1.4, height 1.85
LQM18PN1R0NC0L [mm]
  rect 0.65x0.7 smd: 1(-0.675,0) 2(0.675,0)
  silkscreen extent 0,-0.3 0,0.3, body extent -0.8,-0.4 0.8,0.4, height 0.5
microSD_2 [mm]
  round 0 hole 1: 0(-4.95,-5.25) 0(3.05,-5.25)
  rect 0.7x1.6 smd: 1(2.25,5.25) 2(1.15,5.25) 3(0.05,5.25) 4(-1.05,5.25) 5(-2.15,5.25) 6(-3.25,5.25) 7(-4.35,5.25) 8(-5.45,5.25) 9(-6.55,5.25)
  rect 1.2x2.2 smd: 10(-7.95,-4.85) 10(7.95,-4.85)
  rect 1.4x1.6 smd: 10(-7.85,4.75) 10(6.85,4.75)
  silkscreen extent -7.4,-9.25 7.4,4.55, body extent -8.05,-11.66 8.05,5.75, height 1.95
QFN50P300X300X80-17N [mm]
  rrect25% 0.84x0.28 smd: 1(-1.445,0.75) 2(-1.445,0.25) 3(-1.445,-0.25) 4(-1.445,-0.75) 9(1.445,-0.75) 10(1.445,-0.25) 11(1.445,0.25) 12(1.445,0.75)
  rrect25% 0.28x0.84 smd: 5(-0.75,-1.445) 6(-0.25,-1.445) 7(0.25,-1.445) 8(0.75,-1.445) 13(0.75,1.445) 14(0.25,1.445) 15(-0.25,1.445) 16(-0.75,1.445)
  rect 1.7x1.7 smd paste-0.31: 17(0,0)
  silkscreen extent -2.6,-1.5 1.5,1.5, body extent -1.5,-1.5 1.5,1.5, height 0.8
QFN50P400X400X80-25N-D [mm]
  rect 0.75x0.3 smd: 1(-2,1.25) 2(-2,0.75) 3(-2,0.25) 4(-2,-0.25) 5(-2,-0.75) 6(-2,-1.25) 13(2,-1.25) 14(2,-0.75) 15(2,-0.25) 16(2,0.25) 17(2,0.75) 18(2,1.25)
  rect 0.3x0.75 smd: 7(-1.25,-2) 8(-0.75,-2) 9(-0.25,-2) 10(0.25,-2) 11(0.75,-2) 12(1.25,-2) 19(1.25,2) 20(0.75,2) 21(0.25,2) 22(-0.25,2) 23(-0.75,2) 24(-1.25,2)
  rect 2.9x2.9 smd: 25(0,0)
  silkscreen extent -2.5,1.88 -2.25,2.12, body extent -2.05,-2.05 2.05,2.05, height 0.8
QFN50P500X500X100-33N-D [mm]
  rect 0.85x0.3 smd: 1(-2.45,1.75) 2(-2.45,1.25) 3(-2.45,0.75) 4(-2.45,0.25) 5(-2.45,-0.25) 6(-2.45,-0.75) 7(-2.45,-1.25) 8(-2.45,-1.75) 17(2.45,-1.75) 18(2.45,-1.25) 19(2.45,-0.75) 20(2.45,-0.25) 21(2.45,0.25) 22(2.45,0.75) 23(2.45,1.25) 24(2.45,1.75)
  rect 0.3x0.85 smd: 9(-1.75,-2.45) 10(-1.25,-2.45) 11(-0.75,-2.45) 12(-0.25,-2.45) 13(0.25,-2.45) 14(0.75,-2.45) 15(1.25,-2.45) 16(1.75,-2.45) 25(1.75,2.45) 26(1.25,2.45) 27(0.75,2.45) 28(0.25,2.45) 29(-0.25,2.45) 30(-0.75,2.45) 31(-1.25,2.45) 32(-1.75,2.45)
  rect 3.25x3.25 smd: 33(0,0)
  silkscreen extent -3,2.38 -2.75,2.62, body extent -2.55,-2.55 2.55,2.55, height 1
R38_THT_2 [mm]
  round 0.91 hole 0.56: 1(-1.039,-0.002) 2(1.031,-0.002)
  silkscreen extent -1.7,-1.5 1.7,1.6, body extent -1.63,-1.6 1.55,1.6, height 9.3
RES_0402 [mm]
  rect 0.6x0.55 smd mask+0.102: 1(-0.425,0) 2(0.425,0)
  silkscreen extent -0.87,-0.43 0.88,0.43, body extent -0.5,-0.25 0.5,0.25, height 0.25
RES_0603#1 [mm]
  rect 0.95x0.95 smd mask+0.102: 1(-0.725,0) 2(0.725,0)
  silkscreen extent -1.36,-0.6 1.36,0.63, body extent -0.8,-0.4 0.8,0.4, height 0.9
RES_0603#2 [mm]
  rect 0.9x0.65 smd: 1(0,0.725) 2(0,-0.725)
  silkscreen extent -0.55,-0.2 0.55,0.2, body extent -0.4,-0.79 0.39,0.81, height 0.5
RES_0805 [mm]
  rect 1.3x0.9 smd: 1(0,1.05) 2(0,-1.05)
  silkscreen extent -0.8,-0.4 0.8,0.4, body extent -0.64,-1.03 0.63,0.98, height 0.63
SOD-123 [mm]
  rect 0.915x1.22 smd: 1(-1.637,0) 2(1.637,0)
  silkscreen extent -2.74,-1.17 2.03,1.17, body extent -1.93,-0.9 1.93,0.9, height 1.35
SOD-123F [mm]
  rect 1.2x1.2 smd paste-0.05: 1(-1.4,0) 2(1.4,0)
  silkscreen extent -2.64,-1.12 2.01,1.12, body extent -1.8,-0.85 1.8,0.85, height 1.2
SOT95P280X125-5N [mm]
  rect 1.25x0.6 smd: 1(-1.25,0.95) 2(-1.25,0) 3(-1.25,-0.95) 4(1.25,-0.95) 5(1.25,0.95)
  silkscreen extent -1.88,-1.46 0.28,1.5, body extent -1.4,-1.46 1.4,1.46, height 1.25
SOT-23-3 [mm]
  rect 1x0.55 smd: 1(-1.35,0.95) 2(-1.35,-0.95) 3(1.35,0)
  silkscreen extent -1.9,-1.5 0.45,1.6, body extent -1.25,-1.5 1.25,1.5, height 1.1